# Altium PCB PCAP01模块.pcbdoc
Units mm, origin at the board's own origin, x right, y up, seen from the top; angles counter-clockwise.
Board outline 41.02 x 36.83 mm, 2 copper layers (Top Layer, Bottom Layer); 22 components, 17 nets, 79 pads, 67 vias.
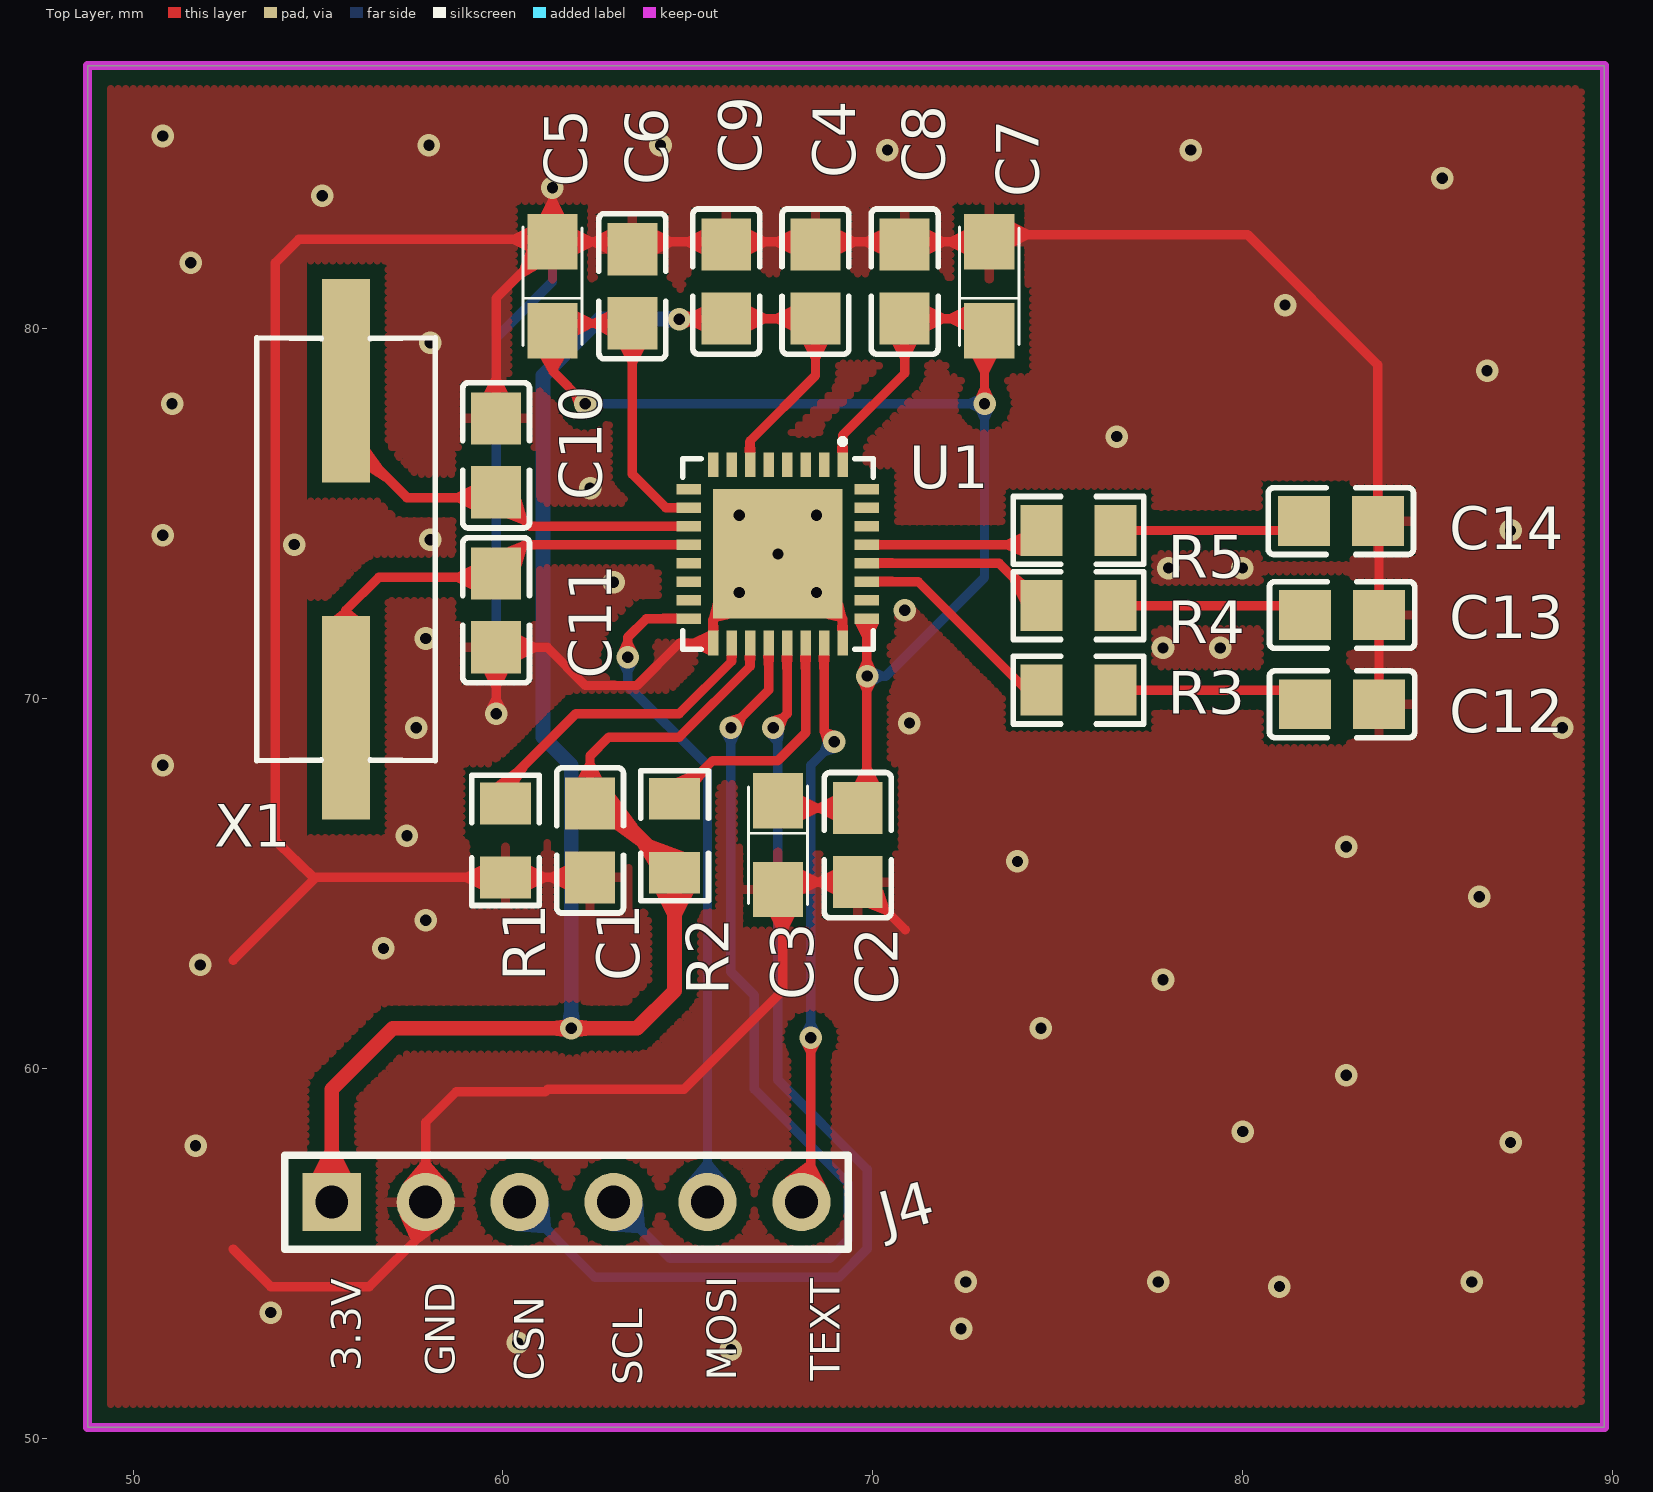
[diagram p0: Top Layer view]
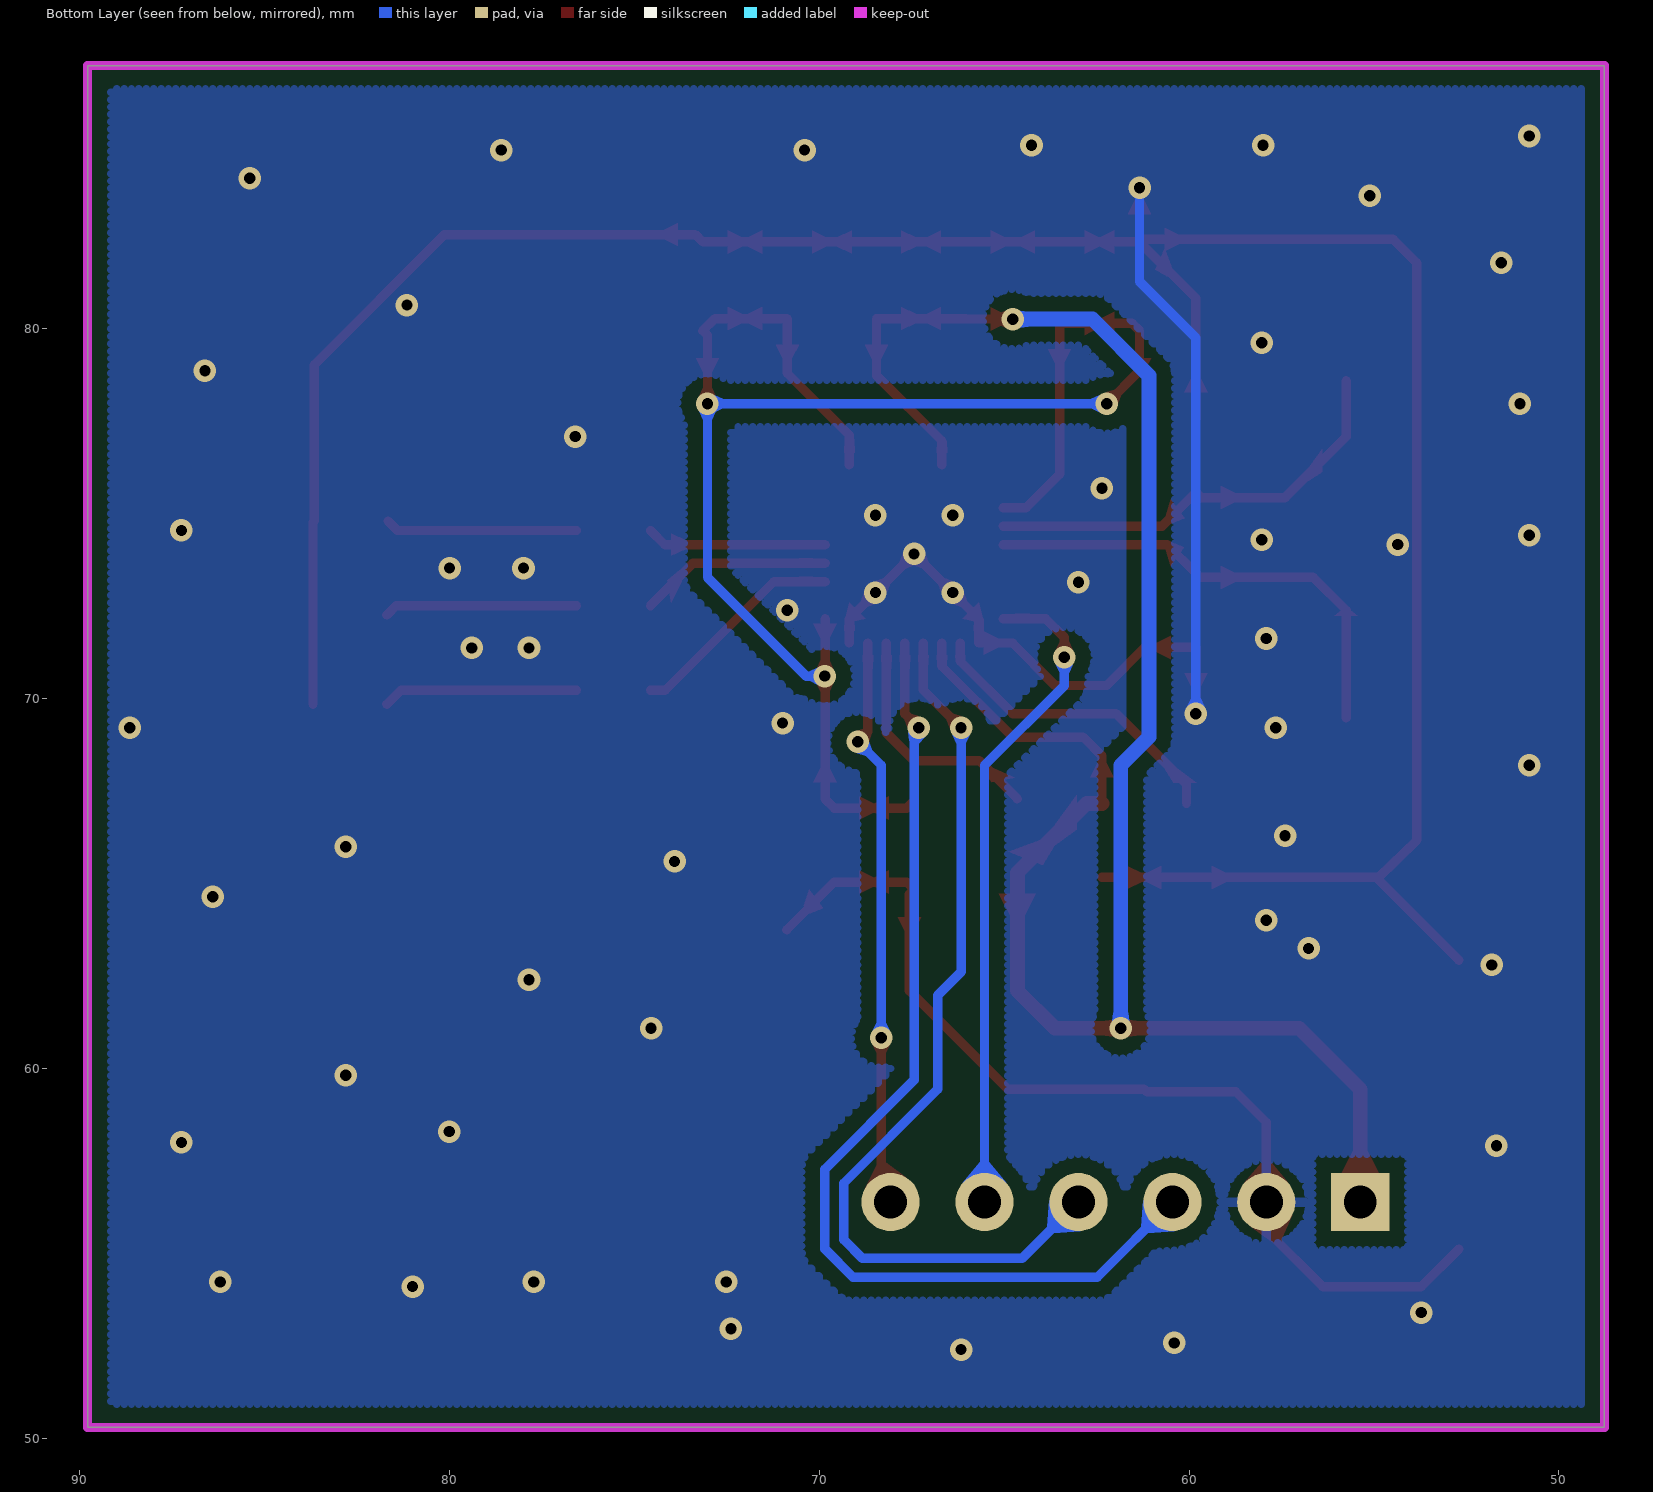
[diagram p1: Bottom Layer view, seen from below]

## Layer stack, top to bottom
Top Solder: solder mask 0.0102, Solder Resist, Dk 3.5
Top Layer: signal copper 0.0356
Dielectric1: dielectric 0.32, FR-4, Dk 4.8
Bottom Layer: signal copper 0.0356
Bottom Solder: solder mask 0.0102, Solder Resist, Dk 3.5

## Board outline
48.768,50.292 89.789,50.292 89.789,87.122 48.768,87.122

## Design rules (kind name [scope] priority, off if disabled: settings)
Clearance Clearance_1 [InPolygon] p1: gap=0.4 ignorepadtopadclearanceinfootprint=TRUE
Clearance [All] p2: gap=0.127 ignorepadtopadclearanceinfootprint=TRUE
ComponentClearance [All] p1 off: gap=0.254 collisioncheckmode=3 verticalgap=0.254 showdistances=FALSE
Height [All] p1 off: minheight=0 maxheight=25.4 prefheight=12.7
HoleToHoleClearance [All] p1: gap=0 allowstackedmicrovias=TRUE
MinimumSolderMaskSliver [All] p1: minsoldermaskwidth=0
PolygonConnect PolygonConnect_1 [ISVIA] p1: connectstyle=Direct reliefconductorwidth=0.254 reliefentries=4 polygonreliefangle="90 Angle" airgapwidth=0.254
PolygonConnect [All] p2: connectstyle=Relief reliefconductorwidth=0.254 reliefentries=4 polygonreliefangle="90 Angle" airgapwidth=0.254
RoutingVias [All] p1: holewidth=0.711 width=1.27 viastyle="Through Hole" minholewidth=0.711 minwidth=1.27 maxholewidth=0.711 maxwidth=1.27
SilkToSilkClearance [All] p1: silktosilkclearance=0
SilkToSolderMaskClearance [IsPad] p1: minsilkscreentomaskgap=0 clearancetoexposedcopper=TRUE
SolderMaskExpansion [All] p1: expansion=0.102
Width [All] p1: maxlimit=5 minlimit=0.1 preferedwidth=0.254
24 further rules are at their usual default settings.

## Components (designator, comment, footprint, x,y, rotation, side; value= is the part's Value field where it differs from the comment)
C1 "0.1u" C0805 62.357,66.167 r90 top
C2 "0.1u" C0805 69.596,66.04 r90 top
C3 "4.7uF" CASE-A_3216 67.437,66.04 r270 top
C4 "0.1u" C0805 68.453,81.28 r270 top
C5 "4.7uF" CASE-A_3216 61.341,81.153 r90 top
C6 "0.1u" C0805 63.5,81.153 r270 top
C7 "4.7uF" CASE-A_3216 73.152,81.153 r90 top
C8 "0.1u" C0805 70.866,81.28 r270 top
C9 "106" C0805 66.04,81.28 r270 top
C10 "NC" C0805 59.817,76.581 r270 top
C11 "NC" C0805 59.817,72.39 r90 top
C12 "0.1u" C0805 82.693,69.85 r180 top (schematic designator C4)
C13 "0.1u" C0805 82.693,72.263 r180 top (schematic designator C4)
C14 "0.1u" C0805 82.661,74.803 r180 top (schematic designator C4)
J4 "HDR-M-2.54_1x6" HDR-M-2.54_1X6 61.722,56.388 r0 top
R1 "470K" R0805 60.071,66.167 r90 top
R2 "8.2K" R0805 64.643,66.294 r270 top
R3 "8.2K" R0805 75.565,70.231 r0 top
R4 "8.2K" R0805 75.565,72.517 r0 top
R5 "8.2K" R0805 75.565,74.549 r0 top
U1 "PCAP01AD" VQFN-32_L5.0-W5.0-P0.50-TL-EP 67.437,73.914 r270 top
X1 "4MHz" HC-49S_L11.4-W4.8 55.753,74.041 r270 top

## Footprints (in the part's own frame and the unit in brackets; to place one, negate y for a bottom-side part, rotate by r counter-clockwise, add the part's x,y. Pads: shape width x height; smd on the part's side, far side on the other; paste and mask are expansions set on the pad)
C0805 [mm]
  rect 1.41x1.35 smd: 1(-1,0) 2(1,0)
  silkscreen extent -1.96,-0.9 1.96,0.9
CASE-A_3216 [mm]
  rect 1.5x1.359 smd: 1(-1.2,0) 2(1.2,0)
  silkscreen extent -1.6,-0.8 1.6,0.8
HC-49S_L11.4-W4.8 [mm]
  rect 5.5x1.3 smd: 1(-4.553,0) 2(4.553,0)
  silkscreen extent -5.72,-2.41 5.72,2.41
HDR-M-2.54_1X6 [mil]
  rect 62x62 hole 35: 1(-250,0)
  round 62 hole 35: 2(-150,0) 3(-50,0) 4(50,0) 5(150,0) 6(250,0)
  silkscreen extent -300,-50 300,50
R0805 [mm]
  rect 1.133x1.377 smd: 1(-1,0) 2(1,0)
  silkscreen extent -1.76,-0.92 1.76,0.92
VQFN-32_L5.0-W5.0-P0.50-TL-EP [mm]
  rect 0.665x0.28 smd: 1(-2.407,1.75) 2(-2.407,1.25) 3(-2.407,0.75) 4(-2.407,0.25) 5(-2.407,-0.25) 6(-2.407,-0.75) 7(-2.407,-1.25) 8(-2.407,-1.75) 17(2.407,-1.75) 18(2.407,-1.25) 19(2.407,-0.75) 20(2.407,-0.25) 21(2.407,0.25) 22(2.407,0.75) 23(2.407,1.25) 24(2.407,1.75)
  rect 0.28x0.665 smd: 9(-1.75,-2.407) 10(-1.25,-2.407) 11(-0.75,-2.407) 12(-0.25,-2.407) 13(0.25,-2.407) 14(0.75,-2.407) 15(1.25,-2.407) 16(1.75,-2.407) 25(1.75,2.407) 26(1.25,2.407) 27(0.75,2.407) 28(0.25,2.407) 29(-0.25,2.407) 30(-0.75,2.407) 31(-1.25,2.407) 32(-1.75,2.407)
  rect 3.5x3.5 smd: 33(0,0)
  silkscreen extent -3.11,-2.58 2.58,2.58

## Via types
v1: diameter 0.61, hole 0.305, Top Layer to Bottom Layer, tented both sides, 67 vias

## Nets (pads, with @x,y where several pads share a name; then routed paths per layer and width w, separated by ;. In a path a pad name is that pad's centre, name@x,y a point inside that pad or via, vN(x,y) a via of type N, cw(c..) or ccw(c..) an arc to the next point about the centre after c; other vN are vias at no path point)
3.3V: C1.2 C4.2 C9.2 J4.1 R2.2 U1.6 U1.19 | length 57.6
  Top Layer w0.254: C1.2 62.357,68.453 62.865,68.961 64.77,68.961 66.688,70.879 U1.19 ; v1(64.77,80.264) C9.2 C4.2 68.453,78.74 66.688,76.975 U1.6
  Top Layer w0.4: J4.1 55.372,59.436 57.023,61.087 63.627,61.087 64.643,62.103 R2.2 62.771,67.168 C1.2
  Bottom Layer w0.4: v1(61.849,61.087) 61.849,68.199 61.087,68.961 61.087,78.74 62.611,80.264 v1(64.77,80.264)
BUFFCAP: C2.2 C3.1 C5.1 C6.2 C7.1 C8.2 U1.1 U1.10 U1.25 | length 47
  Top Layer w0.254: v1@62.357,77.978 v1(62.23,77.978) 61.341,78.867 C5.1 61.542,80.152 C6.2 63.5,76.073 64.409,75.164 U1.10 ; C3.1 67.638,67.041 C2.2 69.845,67.29 U1.25 ; U1.1 69.187,77.122 70.866,78.801 C8.2 72.824,80.279 C7.1 73.025,79.827 v1(73.025,77.978)
  Bottom Layer w0.254: v1(62.23,77.978) v1(73.025,77.978) 73.025,73.279 70.358,70.612 v1(69.85,70.612)
GND: C1.1 C2.1 C3.2 C4.1 C5.2 C6.1 C7.2 C8.1 C9.1 C10.1 C11.1 C12.1 C13.1 C14.1 J4.2 R1.1 U1.17 U1.24 U1.33 | length 132.2
  Top Layer w0.254: 52.705,55.118 53.721,54.102 56.388,54.102 57.912,55.626 J4.2 57.912,58.547 58.737,59.372 61.151,59.372 61.214,59.436 64.897,59.436 67.564,62.103 67.564,64.714 C3.2 67.638,65.039 C2.1 70.881,63.754 ; 52.705,62.929 54.942,65.166 ; v1(59.817,69.596) C11.1 61.199,71.389 62.23,70.358 63.627,70.358 64.77,71.501 U1.17 65.687,72.164 v1(67.437,73.914) 69.187,72.164 U1.24 ; C10.1 59.817,80.828 C5.2 ; C5.2 v1(61.341,83.82) ; C1.1 54.879,65.166 53.848,66.167 53.848,81.788 54.483,82.423 61.27,82.423 C5.2 ; C12.1 C13.1 83.693,74.771 C14.1 83.661,79.026 80.137,82.55 73.35,82.55 C7.2 C5.2
  Bottom Layer w0.254: v1(59.817,69.596) 59.817,79.756 61.341,81.28 v1(61.341,83.82)
  other v1: 66.167,52.4 60.4,52.578 72.39,52.959 53.721,53.4 81,54.102 72.517,54.229 77.724,54.229 86.2,54.229 51.689,57.912 87.249,58 80.01,58.293 82.804,59.817 74.549,61.087 77.851,62.4 51.816,62.8 56.769,63.246 57.912,64.008 86.4,64.643 73.914,65.6 82.804,66 57.404,66.294 50.8,68.199 57.658,69.215 88.646,69.215 70.993,69.342 77.851,71.374 79.4,71.374 57.912,71.628 70.866,72.39 66.393,72.87 68.481,72.87 62.992,73.152 78,73.533 80,73.533 54.356,74.168 58.039,74.295 50.8,74.422 87.249,74.549 66.393,74.958 68.481,74.958 62.357,75.692 76.6,77.089 51.054,77.978 86.614,78.867 58.039,79.629 81.153,80.645 51.562,81.788 55.118,83.6 85.4,84.074 70.4,84.836 78.6,84.836 58,84.963 64.262,84.963 50.8,85.217
MISO: J4.5 U1.16 | length 18
  Top Layer w0.254: v1(63.373,71.12) 63.373,71.656 63.881,72.164 U1.16
  Bottom Layer w0.254: v1(63.373,71.12) 63.373,70.358 65.532,68.199 J4.5
MOSI: J4.6 U1.23 | length 15.9
  Top Layer w0.254: J4.6 68.326,56.388 v1@68.326,60.96 ; U1.23 68.687,69.108 v1(68.961,68.834)
  Bottom Layer w0.254: v1(68.326,60.833) 68.326,68.199 v1(68.961,68.834)
R3_2: C12.2 R3.2 | length 5.3
  Top Layer w0.254: R3.2 81.312,70.231 C12.2
R4_2: C13.2 R4.2 | length 5.2
  Top Layer w0.254: R4.2 81.439,72.517 C13.2
R5_2: C14.2 R5.2 | length 5.2
  Top Layer w0.254: R5.2 81.407,74.549 C14.2
SCL: J4.4 U1.20 | length 25.1
  Top Layer w0.254: v1(66.167,69.215) 67.188,70.236 U1.20
  Bottom Layer w0.254: J4.4 64.516,54.864 68.834,54.864 69.342,55.372 69.342,56.896 66.802,59.436 66.802,61.976 66.167,62.611 v1(66.167,69.215)
SSN: J4.3 U1.21 | length 28.2
  Top Layer w0.254: v1(67.31,69.215) 67.686,69.591 U1.21
  Bottom Layer w0.254: J4.3 62.484,54.356 69.088,54.356 69.85,55.118 69.85,57.277 67.437,59.69 67.437,69.088 v1(67.31,69.215)
U1_11: C10.2 U1.11 X1.1 | length 11.9
  Top Layer w0.254: X1.1 55.753,77.089 57.404,75.438 59.675,75.438 C10.2 60.734,74.663 U1.11
U1_12: C11.2 U1.12 X1.2 | length 12.9
  Top Layer w0.254: X1.2 55.753,72.39 56.642,73.279 59.705,73.279 C11.2 60.592,74.163 U1.12
U1_18: R1.2 U1.18 | length 8.5
  Top Layer w0.254: R1.2 60.071,67.691 61.976,69.596 64.77,69.596 66.187,71.013 U1.18
U1_22: R2.1 U1.22 | length 6.7
  Top Layer w0.254: R2.1 65.674,68.326 67.437,68.326 68.186,69.075 U1.22
U1_27: R3.1 U1.27 | length 5.9
  Top Layer w0.254: U1.27 71.234,73.165 74.168,70.231 R3.1
U1_28: R4.1 U1.28 | length 5.2
  Top Layer w0.254: U1.28 73.419,73.665 R4.1
U1_29: R5.1 U1.29 | length 4.9
  Top Layer w0.254: U1.29 74.181,74.163 R5.1
pads on no net: U1.2 U1.3 U1.4 U1.5 U1.7 U1.8 U1.9 U1.13 U1.14 U1.15 U1.26 U1.30 U1.31 U1.32

## Polygon pours and split planes (outlines as drawn)
GND on Top Layer "Top Layer-GND" (hatched 90Degree grid 0.2 track 0.2, remove dead copper, pour order 10): 48.768,50.292 89.662,50.292 89.789,50.165 89.789,87.122 48.768,87.122
GND on Bottom Layer "Top Layer-GND" (hatched 90Degree grid 0.2 track 0.2, remove dead copper, pour order 12): 48.768,50.292 89.789,50.292 89.789,87.122 48.768,87.122

## Other copper
Top Layer:
  region net MOSI: 67.622,57.034 68.769,56.754 68.453,57.398 68.199,57.46
  region net GND: 58.503,56.909 57.321,56.909 57.785,57.46 58.039,57.46
  region net GND: 58.35,55.733 57.208,56.036 57.496,55.389 57.78,55.314
  region net SCL: 66.471,69.196 66.148,69.519 66.371,69.598 66.55,69.419
  region net MOSI: 68.98,69.138 68.657,68.815 68.597,69.019 68.776,69.198
  region net SSN: 67.614,69.196 67.291,69.519 67.514,69.598 67.693,69.419
  region net MISO: 63.144,71.322 63.602,71.322 63.5,71.535 63.246,71.535
  region net MOSI: 68.097,60.631 68.555,60.631 68.453,60.418 68.199,60.418
  region net 3.3V: 64.974,80.038 64.969,80.495 65.183,80.396 65.186,80.142
  region net 3.3V: 61.647,60.858 61.647,61.316 61.434,61.287 61.434,60.887
  region net 3.3V: 62.051,60.858 62.051,61.316 62.264,61.287 62.264,60.887
  region net GND: 67.456,73.61 67.133,73.933 67.054,73.71 67.233,73.531
  region net GND: 67.741,73.933 67.418,73.61 67.641,73.531 67.82,73.71
  region net GND: 67.456,73.61 67.133,73.933 67.054,73.71 67.233,73.531
  region net GND: 67.741,73.933 67.418,73.61 67.641,73.531 67.82,73.71
  region net GND: 67.456,73.61 67.133,73.933 67.054,73.71 67.233,73.531
  region net GND: 67.741,73.933 67.418,73.61 67.641,73.531 67.82,73.71
  region net GND: 59.588,69.798 60.046,69.798 59.944,70.011 59.69,70.011
  region net BUFFCAP: 62.249,78.282 61.926,77.959 61.847,78.182 62.026,78.361
  region net BUFFCAP: 72.796,78.18 73.254,78.18 73.152,78.393 72.898,78.393
  region net BUFFCAP: 70.076,70.408 69.619,70.413 69.718,70.199 69.972,70.196
  region net BUFFCAP: 70.076,70.816 69.619,70.811 69.718,71.025 69.972,71.028
  region net GND: 68.501,73.174 68.177,72.851 68.098,73.073 68.278,73.253
  region net GND: 68.786,72.889 68.462,72.565 68.685,72.486 68.865,72.666
  region net GND: 66.697,72.851 66.373,73.174 66.596,73.253 66.776,73.073
  region net GND: 66.412,72.565 66.088,72.889 66.009,72.666 66.189,72.486
  region net 3.3V: 63.032,67.405 63.032,66.462 63.632,66.022 63.632,66.588
  region net 3.3V: 62.039,67.872 62.674,67.872 62.484,68.253 62.23,68.253
  region net GND: 61.682,65.484 61.682,64.849 61.301,65.039 61.301,65.293
  region net BUFFCAP: 68.921,66.723 68.921,67.358 68.54,67.168 68.54,66.914
  region net BUFFCAP: 69.527,67.745 70.162,67.745 69.972,68.126 69.718,68.126
  region net GND: 68.921,65.357 68.921,64.722 68.54,64.912 68.54,65.166
  region net GND: 70.271,64.85 69.9,64.335 70.265,64.19 70.416,64.399
  region net 3.3V: 67.778,79.962 67.778,80.597 67.397,80.406 67.397,80.152
  region net 3.3V: 68.77,79.575 68.135,79.575 68.326,79.194 68.58,79.194
  region net GND: 67.778,82.669 67.778,82.034 67.397,82.225 67.397,82.479
  region net GND: 69.128,82.034 69.128,82.669 69.509,82.479 69.509,82.225
  region net BUFFCAP: 62.825,79.835 62.825,80.47 62.444,80.279 62.444,80.025
  region net BUFFCAP: 63.817,79.448 63.182,79.448 63.373,79.067 63.627,79.067
  region net GND: 62.825,82.669 62.825,82.034 62.444,82.225 62.444,82.479
  region net GND: 64.175,82.034 64.175,82.669 64.556,82.479 64.556,82.225
  region net BUFFCAP: 71.541,80.597 71.541,79.962 71.922,80.152 71.922,80.406
  region net BUFFCAP: 71.183,79.575 70.549,79.575 70.739,79.194 70.993,79.194
  region net GND: 70.191,82.669 70.191,82.034 69.81,82.225 69.81,82.479
  region net GND: 71.541,82.034 71.541,82.669 71.922,82.479 71.922,82.225
  region net 3.3V: 66.715,80.597 66.715,79.962 67.096,80.152 67.096,80.406
  region net 3.3V: 65.365,79.954 65.365,80.589 64.984,80.394 64.984,80.14
  region net GND: 65.365,82.669 65.365,82.034 64.984,82.225 64.984,82.479
  region net GND: 66.715,82.034 66.715,82.669 67.096,82.479 67.096,82.225
  region net BUFFCAP: 68.116,67.358 68.116,66.723 68.497,66.914 68.497,67.168
  region net GND: 68.116,65.357 68.116,64.722 68.497,64.912 68.497,65.166
  region net GND: 67.882,64.09 67.246,64.09 67.437,63.709 67.691,63.709
  region net BUFFCAP: 62.02,80.47 62.02,79.835 62.401,80.025 62.401,80.279
  region net BUFFCAP: 61.658,79.203 61.023,79.203 61.214,78.867 61.468,78.867
  region net GND: 62.02,82.669 62.02,82.034 62.401,82.225 62.401,82.479
  region net GND: 60.918,81.603 60.662,82.184 60.474,81.665 60.584,81.416
  region net GND: 60.662,82.105 60.662,82.74 60.281,82.55 60.281,82.296
  region net GND: 61.023,83.103 61.658,83.103 61.468,83.484 61.214,83.484
  region net BUFFCAP: 72.473,79.962 72.473,80.597 72.092,80.406 72.092,80.152
  region net BUFFCAP: 73.343,79.203 72.707,79.203 72.898,78.822 73.152,78.822
  region net GND: 72.473,82.034 72.473,82.669 72.092,82.479 72.092,82.225
  region net GND: 73.831,82.867 73.831,82.233 74.212,82.423 74.212,82.677
  region net 3.3V: 54.872,57.175 55.872,57.175 55.572,57.775 55.172,57.775
  region net U1_18: 59.796,67.733 60.431,67.733 60.674,68.114 60.315,68.114
  region net GND: 59.383,65.484 59.383,64.849 59.002,65.039 59.002,65.293
  region net GND: 60.759,64.849 60.759,65.484 61.14,65.293 61.14,65.039
  region net 3.3V: 63.955,65.492 64.884,65.86 64.046,66.173 63.641,66.013
  region net 3.3V: 65.143,64.728 64.143,64.728 64.443,64.128 64.843,64.128
  region net U1_22: 64.707,67.86 65.331,67.743 65.607,68.079 65.305,68.136
  region net U1_28: 73.999,72.582 74.119,73.206 73.783,73.48 73.725,73.178
  region net U1_29: 73.999,74.48 73.999,73.86 73.618,74.036 73.618,74.29
  region net BUFFCAP: 69.047,76.654 69.327,76.654 69.314,77.035 69.06,77.035
  region net 3.3V: 66.547,76.654 66.827,76.654 66.815,76.975 66.561,76.975
  region net BUFFCAP: 64.697,75.024 64.697,75.304 64.409,75.291 64.409,75.037
  region net U1_11: 64.697,74.524 64.697,74.804 64.316,74.79 64.316,74.536
  region net U1_12: 64.697,74.024 64.697,74.304 64.316,74.29 64.316,74.036
  region net MISO: 64.697,72.024 64.697,72.304 64.316,72.291 64.316,72.037
  region net GND: 65.547,71.839 65.827,71.839 65.814,72.164 65.56,72.164
  region net GND: 65.547,71.188 65.547,71.823 65.166,71.63 65.166,71.376
  region net U1_18: 66.327,71.174 66.047,71.174 66.06,71.013 66.314,71.013
  region net 3.3V: 66.827,71.174 66.547,71.174 66.561,70.879 66.815,70.879
  region net SCL: 67.327,71.174 67.047,71.174 67.061,70.793 67.315,70.793
  region net SSN: 67.827,71.174 67.547,71.174 67.559,70.793 67.813,70.793
  region net U1_22: 68.327,71.174 68.047,71.174 68.059,70.793 68.313,70.793
  region net MOSI: 68.827,71.174 68.547,71.174 68.56,70.793 68.814,70.793
  region net GND: 69.047,71.839 69.327,71.839 69.314,72.164 69.06,72.164
  region net BUFFCAP: 70.162,72.024 69.527,72.024 69.718,71.643 69.972,71.643
  region net U1_27: 70.177,73.304 70.177,73.024 70.558,73.038 70.558,73.292
  region net U1_28: 70.177,73.804 70.177,73.524 70.558,73.538 70.558,73.792
  region net U1_29: 70.177,74.304 70.177,74.024 70.558,74.036 70.558,74.29
  region net GND: 66.136,72.164 65.687,72.613 65.597,72.254 65.777,72.074
  region net GND: 69.187,72.613 68.738,72.164 69.097,72.074 69.277,72.254
  region net U1_11: 56.403,76.756 56.403,76.121 56.784,75.878 56.784,76.238
  region net U1_12: 55.435,72.238 56.07,72.238 55.88,72.39 55.626,72.39
  region net U1_11: 60.492,75.391 60.121,74.876 60.486,74.731 60.637,74.94
  region net U1_11: 59.142,75.12 59.142,75.755 58.761,75.565 58.761,75.311
  region net GND: 60.134,78.286 59.499,78.286 59.69,78.667 59.944,78.667
  region net U1_12: 60.126,74.095 60.492,73.576 60.638,74.03 60.49,74.241
  region net U1_12: 59.142,72.962 59.142,73.596 58.761,73.406 58.761,73.152
  region net GND: 60.492,71.072 60.492,71.707 60.873,71.516 60.873,71.262
  region net GND: 59.499,70.685 60.134,70.685 59.944,70.304 59.69,70.304
Bottom Layer:
  region net MISO: 66.123,56.909 64.941,56.909 65.405,57.46 65.659,57.46
  region net SCL: 62.943,55.602 63.778,56.437 63.84,55.72 63.66,55.54
  region net SSN: 60.403,55.602 61.238,56.437 61.3,55.72 61.12,55.54
  region net SCL: 65.938,69.013 66.396,69.013 66.294,68.8 66.04,68.8
  region net MOSI: 68.98,68.53 68.657,68.853 68.578,68.63 68.757,68.451
  region net SSN: 67.154,68.953 67.589,69.093 67.564,68.861 67.31,68.779
  region net MISO: 63.144,70.918 63.602,70.918 63.5,70.705 63.246,70.705
  region net MOSI: 68.097,61.035 68.555,61.035 68.453,61.248 68.199,61.248
  region net 3.3V: 64.568,80.035 64.568,80.493 64.355,80.464 64.355,80.064
  region net 3.3V: 61.62,61.289 62.078,61.289 62.049,61.502 61.649,61.502
  region net GND: 59.588,69.798 60.046,69.798 59.944,70.011 59.69,70.011
  region net BUFFCAP: 62.432,77.749 62.432,78.207 62.645,78.105 62.645,77.851
  region net BUFFCAP: 72.823,77.749 72.823,78.207 72.61,78.105 72.61,77.851
  region net BUFFCAP: 72.796,77.776 73.254,77.776 73.152,77.563 72.898,77.563
  region net BUFFCAP: 70.052,70.383 70.052,70.841 70.265,70.739 70.265,70.485

## Silkscreen, mask and mechanical layers (free items; w line width, h text height)
Top Overlay:
  text "3.3V" at 56.153,51.816 h0.8 r90
  text "GND" at 58.693,51.689 h0.8 r90
  text "CSN" at 61.106,51.562 h0.8 r90
  text "MOSI" at 66.313,51.562 h0.8 r90
  text "TEXT" at 69.107,51.562 h0.8 r90
  text "SCL" at 63.773,51.435 h0.8 r90